# Altium PCB ESP_TAS5825M.PcbDoc
Units mm, origin at the board's own origin, x right, y up, seen from the top; angles counter-clockwise.
Board outline 77.53 x 50.13 mm, 2 copper layers (Top Layer, Bottom Layer); 44 components, 32 nets, 148 pads, 126 vias.
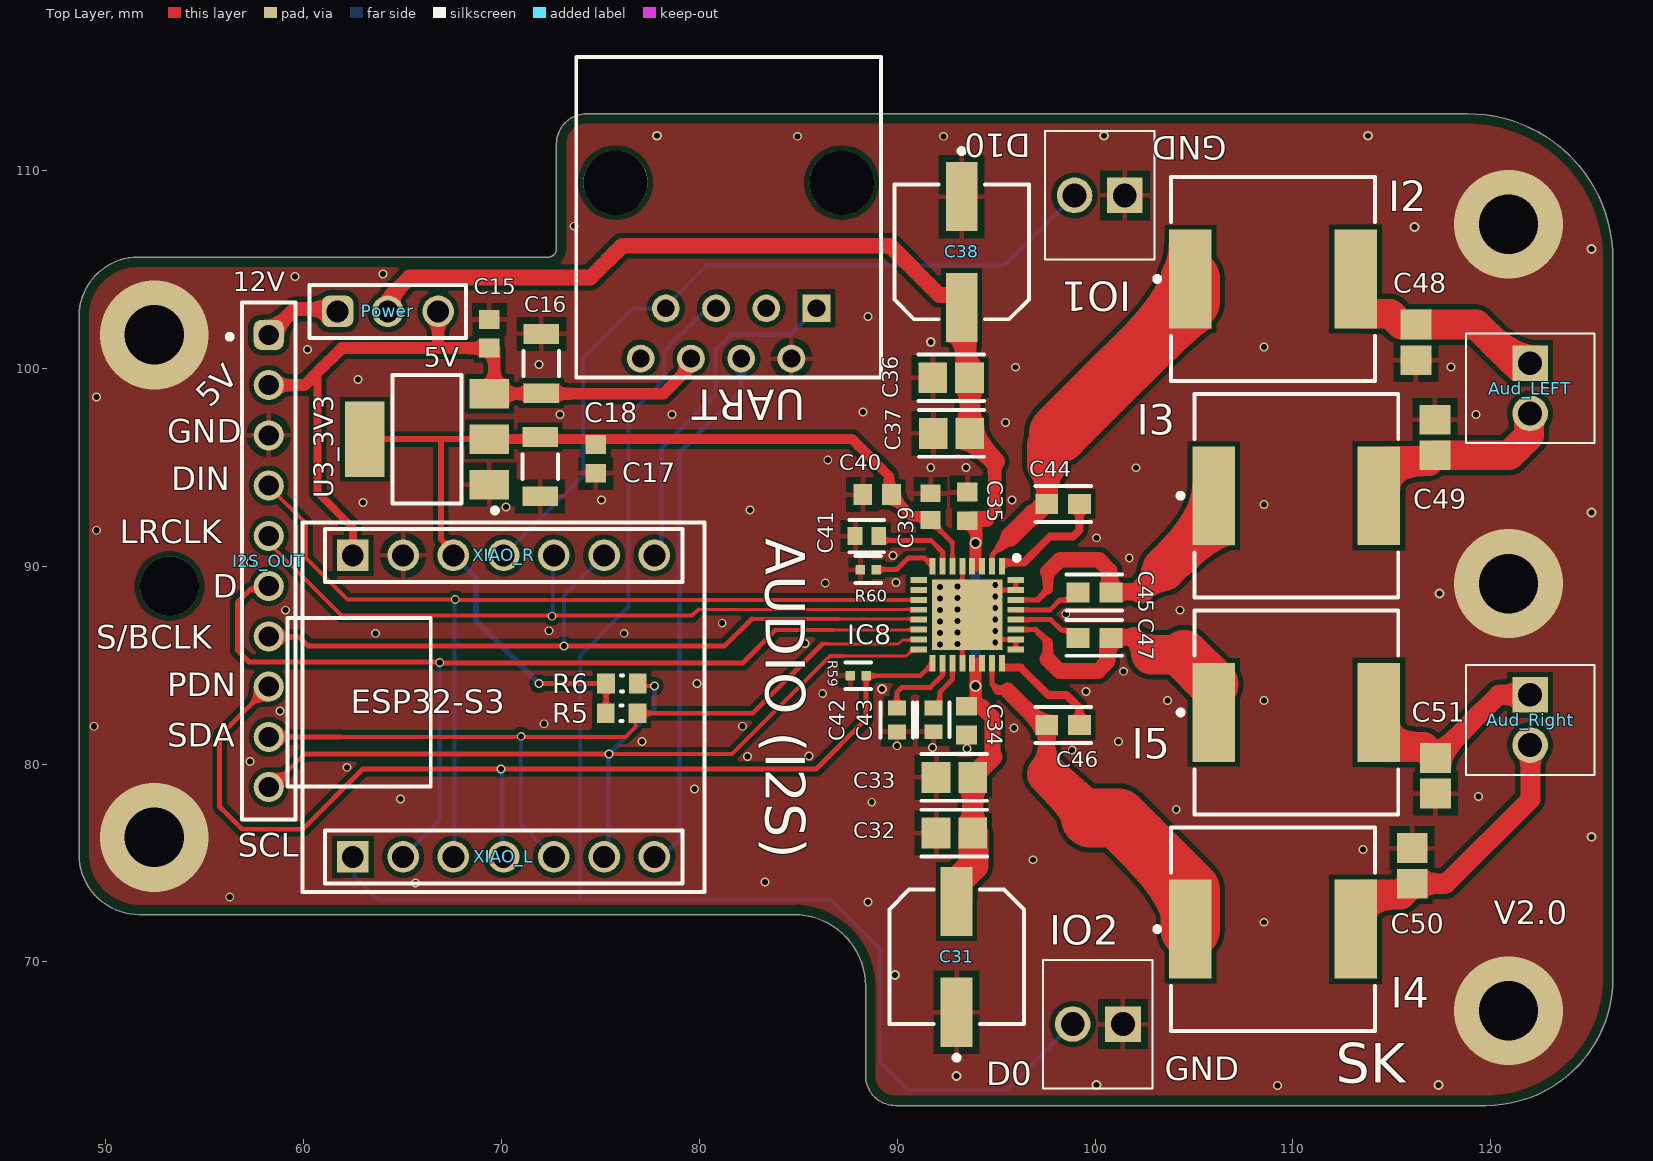
[diagram p0: Top Layer view]
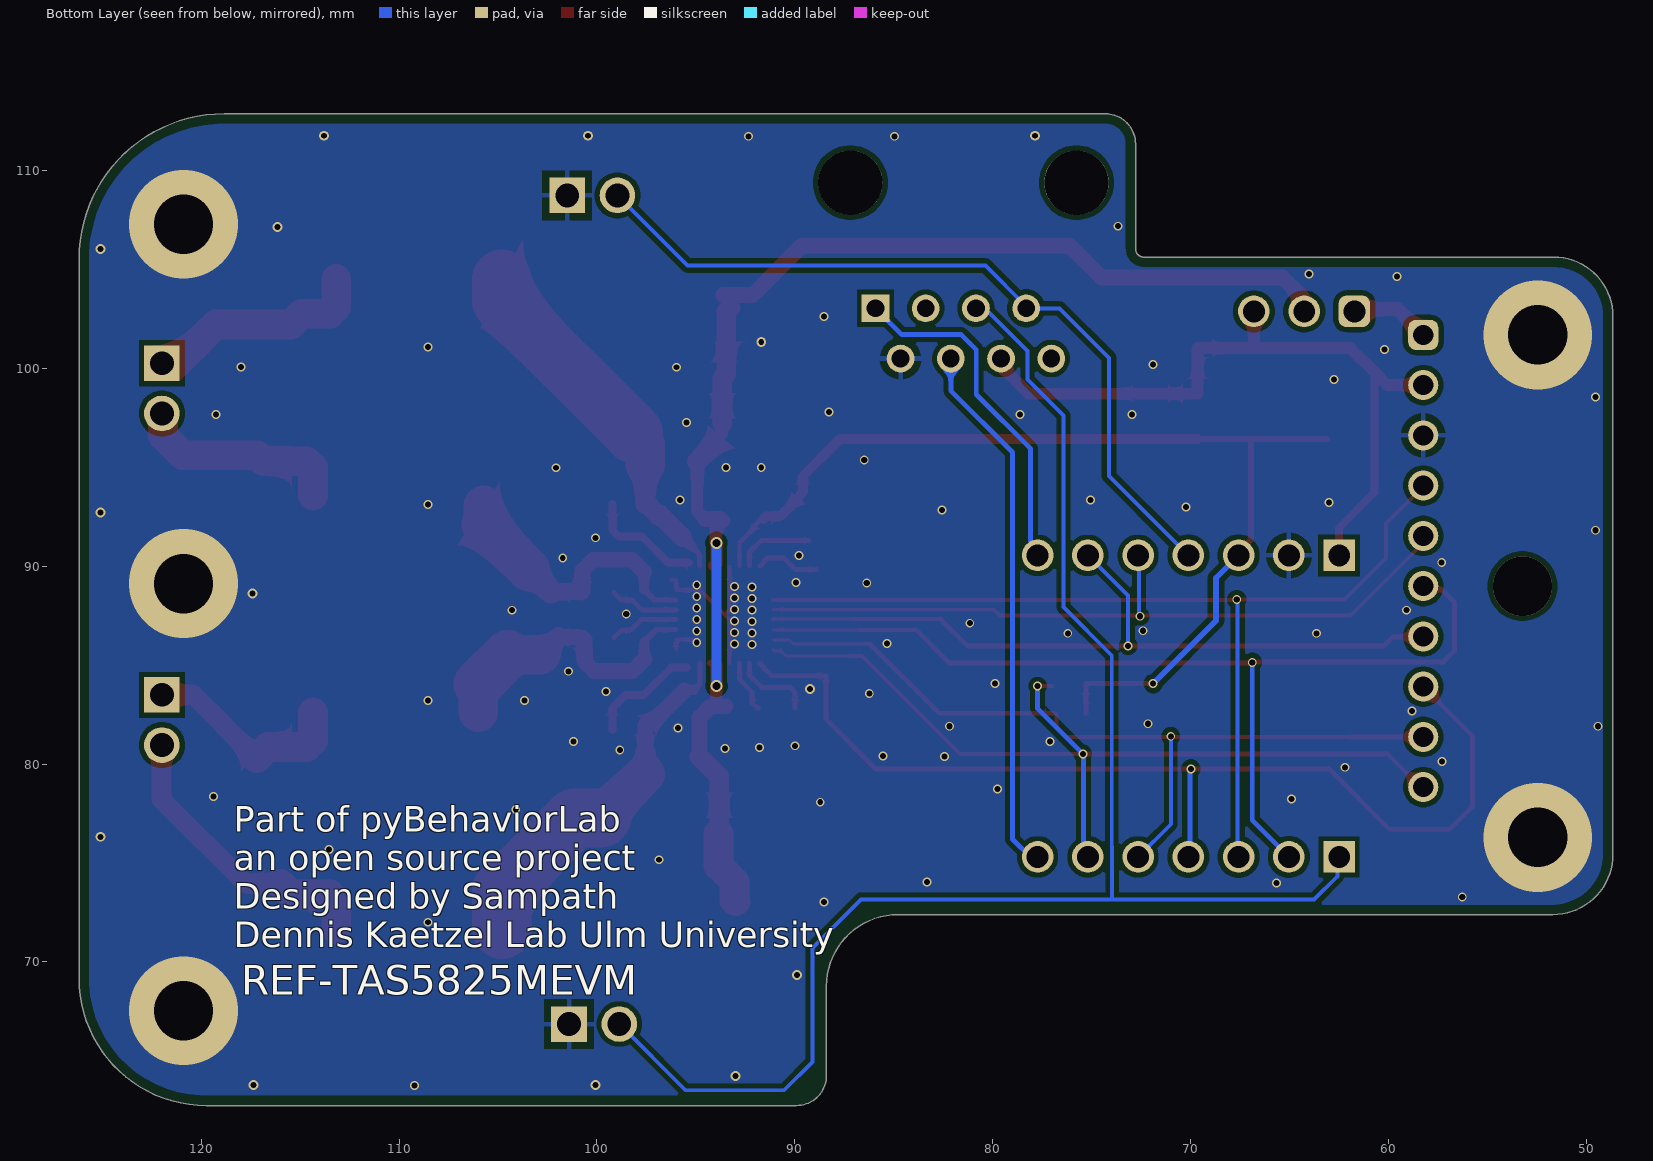
[diagram p1: Bottom Layer view, seen from below]
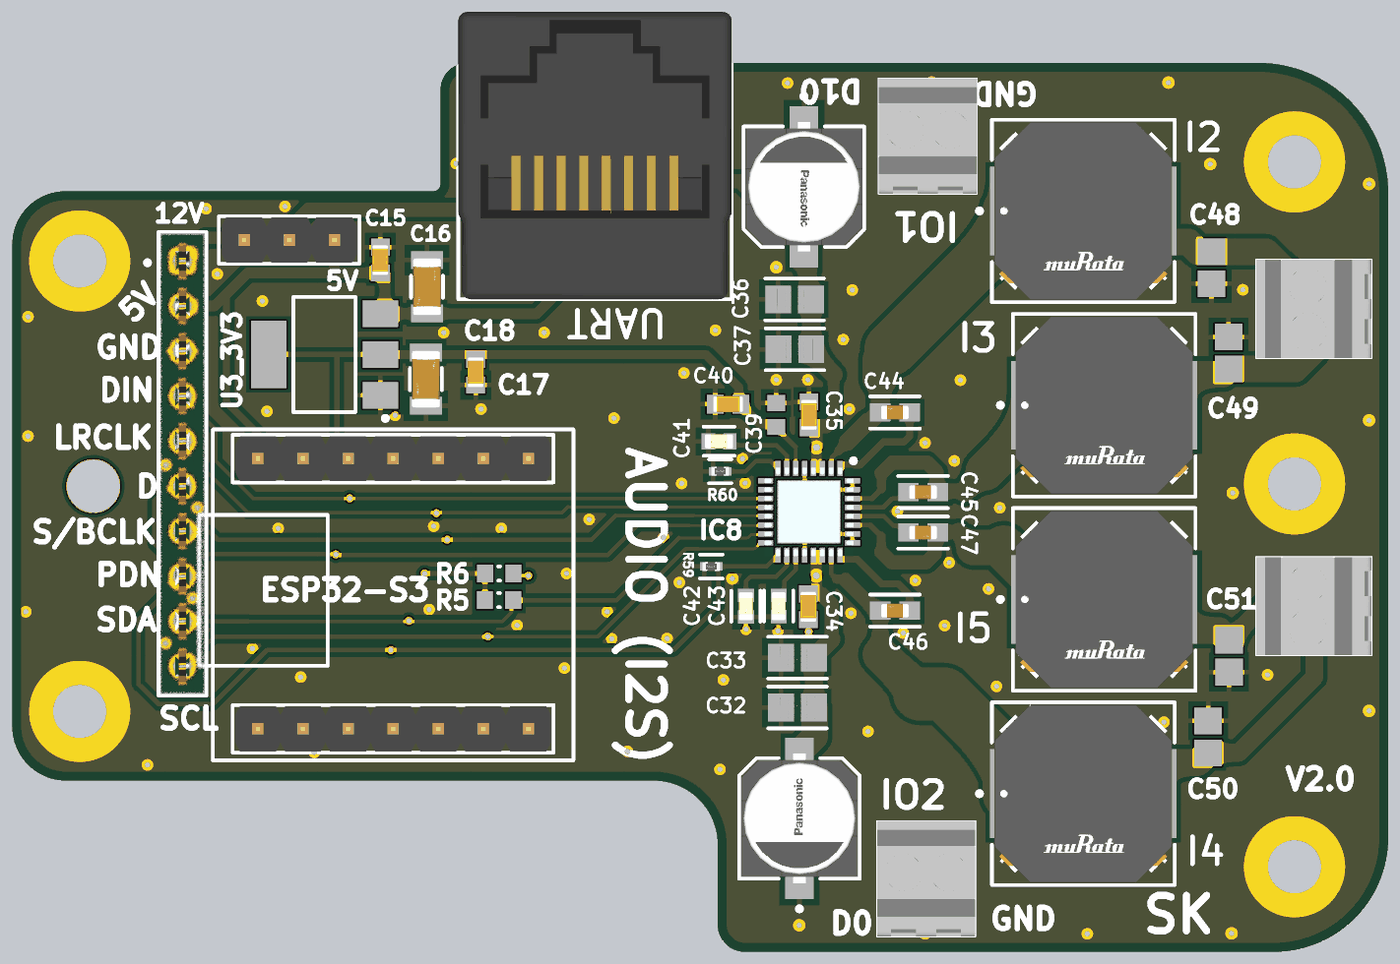
[diagram p2: 3D render of the assembled board from above, using the file's embedded part models]

## Layer stack, top to bottom
Top Solder: solder mask 0.0102, Solder Resist, Dk 3.5
Top Layer: signal copper 0.0356
Dielectric 1: dielectric 0.32, FR-4, Dk 4.8
Bottom Layer: signal copper 0.0356
Bottom Solder: solder mask 0.0102, Solder Resist, Dk 3.5

## Board outline
48.645,75.438 48.645,102.64 cw(c51.635,102.64) 51.635,105.631 72.36,105.631 ccw(c72.36,106.045) 72.775,106.045 72.775,111.349 cw(c74.295,111.349) 74.083,112.855 74.168,112.87 118.84,112.87 cw(c118.84,105.536) 126.174,105.536 126.174,69.173 cw(c119.742,69.173) 119.742,62.742 92.71,62.742 89.916,62.742 cw(c89.916,64.262) 88.396,64.262 88.396,68.782 ccw(c84.784,68.782) 84.784,72.394 51.689,72.394 cw(c51.689,75.438)

## Design rules (kind name [scope] priority, off if disabled: settings)
BoardOutlineClearance [All] p1: gap=0.254 ignorepadtopadclearanceinfootprint=FALSE except(0: Arc-SplitContinuation Track-SplitContinuation SMDPad-SplitContinuation THPad-SplitContinuation Via-SplitContinuation Fill-SplitContinuation Poly-SplitContinuation Region-SplitContinuation Text-SplitContinuation; 0.5: Poly-OutlineEdge Poly-CavityEdge Poly-CutoutEdge Poly-SplitBarrior)
Clearance [All] p1: gap=0.254 ignorepadtopadclearanceinfootprint=FALSE except(0.127: Arc-Arc Arc-Track Track-Track SMDPad-SMDPad; 0.2: Arc-SMDPad Track-SMDPad; 0.33: Arc-THPad Track-THPad; 0.5: THPad-THPad)
DiffPairsRouting [All] p1: maxlimit=0.203 minlimit=0.203 mostfreqgap=0.203 toplayer_minwidth=0.109 toplayer_maxwidth=0.19 toplayer_prefwidth=0.111 bottomlayer_minwidth=0.109 bottomlayer_maxwidth=0.19 bottomlayer_prefwidth=0.111 impedanceprofiledriven=TRUE maxuncoupledlength=12.7
MatchedLengths MatchedLengths_QSPI2 [InNetClass('QSPI')] p1: tolerance=7 checknetsindiffpair=FALSE checkdiffpairvsdiffpair=TRUE checkxsignals=TRUE checkothers=TRUE
PlaneClearance [All] p1: clearance=0.6
PlaneConnect [All] p1: pad.planeconnectstyle=Relief pad.reliefexpansion=0.508 pad.reliefentries=4 pad.reliefconductorwidth=0.254 pad.reliefairgap=0.254 via.planeconnectstyle=Direct via.reliefexpansion=0.508 via.reliefentries=4 via.reliefconductorwidth=0.254 via.reliefairgap=0.254
PolygonConnect [All] p1: thpad.connectstyle=Relief thpad.reliefconductorwidth=0.254 thpad.reliefentries=4 thpad.polygonreliefangle="90 Angle" thpad.airgapwidth=0.35 smdpad.connectstyle=Relief smdpad.reliefconductorwidth=0.254 smdpad.reliefentries=4 smdpad.polygonreliefangle="90 Angle" smdpad.airgapwidth=0.35 via.connectstyle=Direct via.reliefconductorwidth=0.254 via.reliefentries=4 via.polygonreliefangle="90 Angle" via.airgapwidth=0.254
RoutingVias [All] p1: holewidth=0.2 width=0.45 viastyle="Through Hole" minholewidth=0.2 minwidth=0.4 maxholewidth=3 maxwidth=5
SolderMaskExpansion [All] p1: expansion=0.102 istentingtop=FALSE
SupplyNets "Schematic Supply Nets_10" [InNet('GND')] p1: voltage=0.000
SupplyNets "Schematic Supply Nets_8" [InNet('Audio_POW')] p2: voltage=0.000
SupplyNets "Schematic Supply Nets_5" [InNet('+3V3')] p3: voltage=0.000
SupplyNets "Schematic Supply Nets_2" [InNet('+12V')] p4: voltage=0.000
SupplyNets "Schematic Supply Nets_1" [InNet('+5V')] p5: voltage=0.000
UnRoutedNet [All] p1: checkbadconnections=TRUE
Width [All] p1: maxlimit=5 minlimit=0.1 preferedwidth=0.2 minimp=50.000000 maximp=50.000000 favimp=50.000000
26 further rules are at their usual default settings.

## Classes and differential pairs
component class ESP_TAS5825M: Aud_LEFT Aud_Right C15 C16 C17 C18 C31 C32 C33 C34 C35 C36 C37 C39 C40 C41 C42 C43 C44 C45 C46 C47 C48 C49 C50 C51 I2 I2S_OUT I3 I4 I5 IC8 R5 R6 R59 R60 U3_3V3 UART XIAO_L XIAO_R

## Components (designator, comment, footprint, x,y, rotation, side; value= is the part's Value field where it differs from the comment)
Aud_LEFT "282834-2" 282834-2_1 121.986,100.266 r270 top
Aud_Right "282834-2" 282834-2_1 121.986,83.502 r270 top
C15 "GRM188R71H104KA93D" CAPC1608X90X35ML10T15 69.382,101.753 r270 top
C16 "CC1206KKX5R8BB105" FP-CC1206-1_25-MFG 72.013,100.247 r90 top value="1 uF"
C17 "CC1206KKX5R8BB105" FP-CC1206-1_25-MFG 71.949,95.036 r270 top value="1 uF"
C18 "GRM188R71H104KA93D" CAPC1608X90X35ML10T15 74.757,95.429 r90 top
C31 "25SVPF47M" FP-OS-CON-SMT-C6-MFG 92.998,70.263 r90 top
C32 "CL21A106KAYNNNE" FP-CL21-IPC_A 92.89,76.517 r180 top
C33 "CL21A106KAYNNNE" FP-CL21-IPC_A 92.89,79.327 r180 top
C34 "GRM188R71H104KA93D" CAPC1608X90X35ML10T15 93.506,82.197 r90 top
C35 "GRM188R71H104KA93D" CAPC1608X90X35ML10T15 93.538,93.027 r270 top
C36 "CL21A106KAYNNNE" FP-CL21-IPC_A 92.725,99.529 r180 top
C37 "CL21A106KAYNNNE" FP-CL21-IPC_A 92.741,96.715 r180 top
C38 "25SVPF47M" FP-OS-CON-SMT-C6-MFG 93.252,105.886 r270 top
C39 "C0603C475K8PACTU" CAPC1608X87X35NL15T15 91.685,93.015 r270 top
C40 "GRM188R71H104KA93D" CAPC1608X90X35ML10T15 88.981,93.626 r0 top
C41 "C0603C105K4PACTU" FP-C0603C105K4PACTU-MFG 88.467,91.524 r0 top
C42 "C0603C105K4PACTU" FP-C0603C105K4PACTU-MFG 89.985,82.231 r90 top
C43 "C0603C105K4PACTU" FP-C0603C105K4PACTU-MFG 91.826,82.236 r90 top
C44 "GCM188R71H224KA64D" FP-GCM188-0_1-IPC_A 98.382,93.154 r180 top
C45 "GCM188R71H224KA64D" FP-GCM188-0_1-IPC_A 99.966,88.667 r0 top
C46 "GCM188R71H224KA64D" FP-GCM188-0_1-IPC_A 98.382,81.978 r180 top
C47 "GCM188R71H224KA64D" FP-GCM188-0_1-IPC_A 99.966,86.385 r0 top
C48 "C0805C684K5RACTU" CAPC2013X145X50ML20T25 116.216,101.321 r270 top
C49 "C0805C684K5RACTU" CAPC2013X145X50ML20T25 117.176,96.505 r270 top
C50 "C0805C684K5RACTU" CAPC2013X145X50ML20T25 116.023,74.859 r270 top
C51 "C0805C684K5RACTU" CAPC2013X145X50ML20T25 117.202,79.413 r90 top
I2 "1274AS-H-100M=P3" FP-DEM10050C-MFG 108.992,104.521 r0 top
I2S_OUT "61301011821" 61301011821 58.232,90.267 r270 top
I3 "1274AS-H-100M=P3" FP-DEM10050C-MFG 110.172,93.567 r0 top
I4 "1274AS-H-100M=P3" FP-DEM10050C-MFG 108.992,71.659 r0 top
I5 "1274AS-H-100M=P3" FP-DEM10050C-MFG 110.172,82.613 r0 top
IC8 "TAS5825MRHBR" QFN50P500X500X100-33N-D 93.538,87.552 r270 top
IO1 "282834-2" 282834-2_1 101.502,108.746 r180 top (schematic designator GPIO)
IO2 "282834-2" 282834-2_1 101.408,66.861 r180 top (schematic designator GPIO)
Power "Comment" 61300311121 64.251,102.882 r0 top
R5 "10K" 0603R 76.07,82.572 r0 top value=12K1
R6 "10K" 0603R 76.081,84.072 r0 top value=12K1
R59 "ERJ-2RKF1003X" FP-ERJ2RK-IPC_C 88.027,84.467 r0 top
R60 "ERJ-2RKF1003X" FP-ERJ2RK-IPC_C 88.535,89.833 r0 top
U3_3V3 "NCP1117ST33T3G" ONSC-SOT-223-4-318H-01_A_V 66.234,96.424 r180 top
UART "615008138021" 615008138021 81.475,107.639 r180 top
XIAO_L "61300711121" 61300711121 70.104,75.311 r0 top
XIAO_R "61300711121" 61300711121 70.104,90.551 r0 top

## Footprints (in the part's own frame and the unit in brackets; to place one, negate y for a bottom-side part, rotate by r counter-clockwise, add the part's x,y. Pads: shape width x height; smd on the part's side, far side on the other; paste and mask are expansions set on the pad)
0603R [mm] "Chip Resistor, Body 1.6x0.8mm, IPC Medium Density"
  rect 0.9x1 smd: 1(-0.8,0) 2(0.8,0)
  silkscreen extent -0.05,-0.4 0.05,0.4, body extent -0.85,-0.47 0.85,0.47, height 0.6
282834-2_1 [mm]
  rect 1.8x1.8 hole 1.2: 1(0,0)
  round 1.8 hole 1.2: 2(2.54,0)
  silkscreen extent -1.5,-3.25 4.04,3.25, body extent -1.5,-3.25 4.04,3.25, height 9.87
61300311121 [mm] "Pin Header, pitch 2.54 mm, THT, Vertical, single row, 3p"
  rrect50% 1.6x1.6 hole 1.1: 1(-2.54,0)
  round 1.6 hole 1.1: 2(0,0) 3(2.54,0)
  silkscreen extent -3.96,-1.35 3.96,1.35, body extent -3.81,-1.27 3.81,1.27, height 8.57
61300711121 [mm] "Pin Header, pitch 2.54 mm, THT, Vertical, single row, 7p"
  rect 1.6x1.6 hole 1.1: 1(-7.62,0)
  round 1.6 hole 1.1: 2(-5.08,0) 3(-2.54,0) 4(0,0) 5(2.54,0) 6(5.08,0) 7(7.62,0)
  silkscreen extent -9.04,-1.35 9.04,1.35, body extent -8.89,-1.27 8.89,1.27, height 8.57
61301011821 [mm] "Socket Header, Pitch 2.54 mm, THT, Vertical, single row, 10p"
  rrect50% 1.52x1.52 hole 1.02: 1(-11.43,0)
  round 1.52 hole 1.02: 2(-8.89,0) 3(-6.35,0) 4(-3.81,0) 5(-1.27,0) 6(1.27,0) 7(3.81,0) 8(6.35,0) 9(8.89,0) 10(11.43,0)
  silkscreen extent -13.08,-2.1 13.08,1.35, body extent -12.95,-1.25 12.95,1.25, height 8.55
615008138021 [mm] "Modular Jack Vertical Plastic 8P8C"
  rect 1.4x1.4 hole 0.9: 1(-4.445,4.6)
  round 1.4 hole 0.9: 2(-3.175,7.14) 3(-1.905,4.6) 4(-0.635,7.14) 5(0.635,4.6) 6(1.905,7.14) 7(3.175,4.6) 8(4.445,7.14)
  round 3.25 hole 3.25 unplated: MH1(-5.715,-1.75) MH2(5.715,-1.75)
  silkscreen extent -7.7,-8.1 7.7,8.1, body extent -7.7,-8.1 7.7,8.1, height 16.5
CAPC1608X87X35NL15T15 [mm] "Chip Capacitor, 2-Leads, Body 1.60x0.80mm, IPC Medium Density"
  rect 0.9x1 smd: 1(-0.675,0) 2(0.675,0)
  body extent -0.87,-0.48 0.87,0.47, height 0.87
CAPC1608X90X35ML10T15 [mm] "Chip Capacitor, 2-Leads, Body 1.7x0.9mm, IPC Low Density"
  rect 0.95x1.05 smd: 1(-0.725,0) 2(0.725,0)
  body extent -0.85,-0.45 0.85,0.45, height 0.9
CAPC2013X145X50ML20T25 [mm] "Chip Capacitor, 2-Leads, Body 2.00x1.25mm, IPC Low Density"
  rect 1.5x1.55 smd: 1(-0.9,0) 2(0.9,0)
  body extent -1.1,-0.72 1.1,0.72, height 1.45
FP-C0603C105K4PACTU-MFG [mm]
  rect 0.75x0.9 smd paste+0 mask+0: 1(-0.6,0) 2(0.6,0)
  silkscreen extent -0.87,-0.82 0.87,0.82, body extent -1.2,-0.6 1.2,0.6, height 0.25
FP-CC1206-1_25-MFG [mm]
  rect 1x1.8 smd paste+0 mask+0: 1(-1.5,0) 2(1.5,0)
  silkscreen extent -0.63,-0.9 0.63,0.9, body extent -2.2,-1.25 2.2,1.25, height 0.25
FP-CL21-IPC_A [mm]
  rect 1.455x1.556 smd paste+0 mask+0: 1(-0.926,0) 2(0.926,0)
  silkscreen extent -1.65,-1.18 1.65,1.18, body extent -2.15,-1.28 2.15,1.28, height 0.25
FP-DEM10050C-MFG [mm]
  rect 2.15x5 smd paste+0 mask+0: 1(-4.175,0) 2(4.175,0)
  silkscreen extent -5.97,-5.15 5.15,5.15, body extent -5.35,-5.25 5.35,5.25, height 0.25
FP-ERJ2RK-IPC_C [mm]
  rect 0.468x0.472 smd paste+0 mask+0: 1(-0.402,0) 2(0.402,0)
  silkscreen extent -0.64,-0.67 0.64,0.67, body extent -0.74,-0.38 0.74,0.38, height 0.25
FP-GCM188-0_1-IPC_A [mm]
  rect 1.159x1.012 smd paste+0 mask+0: 1(-0.827,0) 2(0.827,0)
  silkscreen extent -1.41,-0.91 1.41,0.91, body extent -1.91,-1.01 1.91,1.01, height 0.25
FP-OS-CON-SMT-C6-MFG [mm]
  rect 3.5x1.6 smd paste+0 mask+0: 1(-2.8,0) 2(2.8,0)
  silkscreen extent -5.22,-3.4 3.4,3.4, body extent -4.8,-3.65 4.8,3.65, height 0.25
ONSC-SOT-223-4-318H-01_A_V [mm] "SOT223, 4-Leads, Body 6.5x3.5mm, Pitch 2.3mm"
  rect 2x1.5 smd: 1(-3.15,2.3) 2(-3.15,0) 3(-3.15,-2.3)
  rect 2x3.8 smd: 4(3.15,0)
  silkscreen extent -3.55,-3.25 1.75,3.72, body extent -1.75,-3.25 1.75,3.25, height 1.8
QFN50P500X500X100-33N-D [mm]
  rect 0.85x0.3 smd: 1(-2.45,1.75) 2(-2.45,1.25) 3(-2.45,0.75) 4(-2.45,0.25) 5(-2.45,-0.25) 6(-2.45,-0.75) 7(-2.45,-1.25) 8(-2.45,-1.75) 17(2.45,-1.75) 18(2.45,-1.25) 19(2.45,-0.75) 20(2.45,-0.25) 21(2.45,0.25) 22(2.45,0.75) 23(2.45,1.25) 24(2.45,1.75)
  rect 0.3x0.85 smd: 9(-1.75,-2.45) 10(-1.25,-2.45) 11(-0.75,-2.45) 12(-0.25,-2.45) 13(0.25,-2.45) 14(0.75,-2.45) 15(1.25,-2.45) 16(1.75,-2.45) 25(1.75,2.45) 26(1.25,2.45) 27(0.75,2.45) 28(0.25,2.45) 29(-0.25,2.45) 30(-0.75,2.45) 31(-1.25,2.45) 32(-1.75,2.45)
  rect 3.55x3.55 smd: 33(0,0)
  silkscreen extent -3,2.38 -2.75,2.63, body extent -2.55,-2.55 2.55,2.55, height 1

## Part data
Aud_LEFT Aud_Right IO1 IO2: "Connector", Manufacturer_Name="TE Connectivity", Mouser2 Part Number=571-282834-2, Datasheet Link=https://componentsearchengine.com//282834-2.pdf, Manufacturer_Part_Number=282834-2, Mouser2 Price/Stock=https://www.mouser.com/Search/Refine.aspx?Keyword=571-282834-2
C15 C18 C34 C35 C40: library part CMP-2100-03643-1, "Chip Capacitor, 0.1 uF, +/- 10%, 50 V, -55 to 125 degC, 0603 (1608 Metric), RoHS, Tape and Reel (C77055)", Capacitance=100nF, Case Code (Imperial)=0603, Case Code (Metric)=1608, Dielectric=X7R, Dielectric Material=Ceramic, Insulation Resistance=10GR, Manufacturer=Murata, Max Operating Temperature=125degC, Min Operating Temperature=-55degC, Package Description="2-Pin Surface Mount Device, Body 1.6 x 0.8 mm", Package Quantity=1, Tolerance=10%, Voltage=50V, Case/Package=0603, Contact Plating=Tin, Datasheet URL=http://psearch.en.murata.com/capacitor/product/GRM188R71H104KA93%23.pdf, Datasheet Version=42675.0, Depth=0.8mm, Height=0.8mm, Lead Free=LeadFree, Length=1.6mm, Manufacturer URL=http://www.murata.com/, Material=Ceramic, Mount=SurfaceMount, Number of Pins=2, Package Reference=0603, Packaging=TapeandReel, Radiation Hardening=No, REACH SVHC=NoSVHC, RoHSCompliant=true, Termination=SMD/SMT, Thickness=0.035inch, Voltage Rating=50V, Voltage Rating (DC)=50V, Width=0.8mm
C16 C17: library part CMP-03422-001167-1, "10uF 25V X5R ±10% 1206 Multilayer Ceramic Capacitors MLCC - SMD/SMT ROHS (C128855)", Capacitance="1 uF", Manufacturer=Yageo, Package=CC1206-1.25, Temperature="-55°C to +125°C", Temperature Characteristic=X5R, Temperature Coefficient=15%, Temperature Range High=+125°C, Temperature Range Low=-55°C, Tolerance=0.1, Voltage Rating="25 V", Automotive=No, Automotive Grade=NA, Category=Cap, ComponentLink2Description=Datasheet, ComponentLink2URL=http://www.yageo.com/documents/recent/UPY-NP0X7R_HV_1KV-to-3KV_11.pdf, Device Class L1="Passive Components", Device Class L2=Capacitors, Device Class L3="Ceramic Capacitors", Digikey Description="CAP CER 1UF 25V X5R 1206", Footprint Url=http://www.yageo.com/exep/pages/download/literatures/UPY-C_GEN_24.pdf, Height=1.45mm, Lead Free=Yes, Manufacturer Part Number=CC1206KKX5R8BB105, Material=Ceramic, Mouser Description="Multilayer Ceramic Capacitors MLCC - SMD/SMT 1.0uF 25V X5R 10%", Octopart=https://octopart.com/cc1206kkx5r8bb105-yageo-20779154, RoHS=TRUE
C31 C38: library part CMP-05427-000065-2, "Conductive Polymer Aluminum Solid Capacitors (OS-CON) 47uF ±20% 25V (C136280)", Capacitance=47uF, Case/Package=Radial, ESR (Equivalent Series Resistance)=30mR, Leakage Current=235uA, Max Operating Temperature=105°C, Min Operating Temperature=-55°C, Package Quantity=1000, Ripple Current=2.8A, Tolerance=20%, Voltage=25V, Diameter=6.3mm, Dissipation Factor=12%, Height=5.9mm, Height - Seated (Max)=0.236inch, Length=5.9mm, Life (Hours)=5000Hour, Mount="Surface Mount", Number of Pins=6, Packaging="Tape and Reel", Polarity=Polar, REACH SVHC="No SVHC", Ripple Current (AC)=2.8A, RoHS Compliant=Yes, Series="OS-CON™, SVPF", Termination=SMD/SMT, Voltage Rating=25V, Voltage Rating (DC)=25V
C32 C33 C36 C37: library part CMP-13271-002975-1, "CL21 Series 0805 10uF 25V ±10% Tolerance X5R Multilayer Ceramic Chip Capacitor (C15850)", Capacitance=10uF, Case Code (Imperial)=0805, Case Code (Metric)=2012, Dielectric=X5R, Max Operating Temperature=85°C, Min Operating Temperature=-55°C, Package Quantity=1, Tolerance=10%, Voltage Rating=25V, Case/Package=0805, Depth=1.25mm, Height=1.25mm, Length=2mm, Mount="Surface Mount", Packaging="Tape and Reel", Radiation Hardening=No, Thickness=0.057inch, Width=0.049inch
C39: library part CMP-2006-03238-1, "10V 4.7uF X5R ±10% 0603 Multilayer Ceramic Capacitors MLCC - SMD/SMT ROHS (C6475754)", Manufacturer=Kemet, Part Number=C0603C475K8PACTU
C41 C42 C43: library part CMP-2006-02279-2, "CAP CER 1UF 16V X5R 0603 (C2181804)", Capacitance=1uF, Case Code (Imperial)=0603, Case Code (Metric)=1608, Dielectric=X5R, Dielectric Material=Ceramic, Max Operating Temperature=85°C, Min Operating Temperature=-55°C, Package Quantity=4000, Tolerance=10%, Voltage=16V, Case/Package=0603, Construction=Flat, Contact Plating=Tin, Depth=0.8mm, Dissipation Factor=5%, Height=0.8mm, Length=1.6mm, Mount="Surface Mount", Packaging="Tape and Reel", Radiation Hardening=No, Termination=SMD/SMT, Voltage Rating=16V, Voltage Rating (DC)=16V, Width=0.8mm
C44 C45 C46 C47: library part CMP-2006-02383-2, "Ceramic Capacitor for Automotive 220nF  ±10% 50VDC X7R 0603 Paper T/R (C97857)", Capacitance=220nF, Case Code (Imperial)=0603, Case Code (Metric)=1608, Dielectric=X7R, Max Operating Temperature=125°C, Min Operating Temperature=-55°C, Package Quantity=10, Ratings=AEC-Q200, Tolerance=10%, Voltage=50V, Case/Package=0603, Depth=0.8mm, Height=0.8mm, Lead Free="Lead Free", Length=1.6mm, Mount="Surface Mount", Packaging="Tape and Reel", Radiation Hardening=No, REACH SVHC="No SVHC", Termination=SMD/SMT, Thickness=0.035inch, Voltage Rating=50V, Voltage Rating (DC)=50V, Width=0.031inch
C48 C49 C50 C51: library part CMP-1036-04712-2, "0805 Multilayer Ceramic Capacitors MLCC - SMD/SMT ROHS (C22402009)", Manufacturer=Kemet, Part Number=C0805C684K5RACTU
I2 I3 I4 I5: library part CMP-06042-000104-1, "10uH 45mΩ 6.2A 8.5A Molded Inductor ±20% SMD,8.5x8mm Power Inductors ROHS (C41413139)", Case/Package=SMD/SMT, Current Rating=4.4A, DC Resistance (DCR)=30.4mR, Inductance=10uH, Resistor Type=Wirewound, Saturation Current=6.2A, Test Frequency=100kHz, Tolerance=20%, Core Material=Ferrite, Height - Seated (Max)=0.199inch, Length=0.394inch, Max DC Current=4.4A, Mount="Surface Mount", Number of Pins=2, Packaging="Tape and Reel", Shielding=Shielded, Width=0.394inch
I2S_OUT: library part CMP-1502-01332-4, "THT Vertical Socket Header WR-PHD, Pitch 2.54 mm, Single Row, 10 pins", Color=Black, Contact Resistance=20mΩ, Current Rating=3A, Flammability Rating="UL94 V-0", Insulation Resistance=1GΩ, Max Operating Temperature=125°C, Min Operating Temperature=-40°C, Operating Supply Voltage=250V, Connector Type="Header, Socket", Contact Gender=Female, Contact Material=Copper, Contact Plating=Gold, Gender=Female, Height=8.5mm, Housing Material=PBT, Insulation=Insulated, Lead Free="Lead Free", Lead Pitch=2.54mm, Length=25.9mm, Mount="Through Hole", Number Of Contacts=10, Number of Pins=10, Number of Positions=10, Number Of Rows=1, Orientation=Vertical, Pitch=2.54mm, RoHS=Compliant, Termination="Through Hole", Voltage Rating=250V, Width=25.9mm
IC8: "-25℃~+85℃ 0.03% 111dB 17.5mA 2-Channel 38Wx1@8Ω 4.5V~26.4V 72dB 90% Class D VQFN-32(5x5) Audio Amplifiers ROHS (C471049)", Manufacturer_Name="Texas Instruments", Mouser Part Number=595-TAS5825MRHBR, Arrow Part Number=TAS5825MRHBR, Arrow Price/Stock=https://www.arrow.com/en/products/tas5825mrhbr/texas-instruments?region=nac, Datasheet Link=http://www.ti.com/lit/gpn/tas5825m, Height=1mm, Manufacturer_Part_Number=TAS5825MRHBR, Mouser Price/Stock=https://www.mouser.co.uk/ProductDetail/Texas-Instruments/TAS5825MRHBR?qs=f9yNj16SXrKGX4MqJgnnYg%3D%3D
R5: library part Res_12K1_1%_0603, "-55?~+155? 100mW 2.2kO 75V Thick Film Resistor ±1% ±100ppm/? 0603 Chip Resistor - Surface Mount ROHS (C125931)", Manuf_1=VISHAY, Manuf_Part_1="MCT 0603-50 1% P5 12K1", Distrib=FARNELL, ECCN_US/EU=n/a, Order=2325243
R6: library part Res_12K1_1%_0603, "-55℃~+155℃ 100mW 10kΩ 75V Thick Film Resistor ±1% ±100ppm/℃ 0603 Chip Resistor - Surface Mount ROHS (C99198)", Manuf_1=VISHAY, Manuf_Part_1="MCT 0603-50 1% P5 12K1", Distrib=FARNELL, ECCN_US/EU=n/a, Order=2325243
R59 R60: library part CMP-2002-00608-4, "RES SMD 100K OHM 1% 1/10W 0402 (C192169)", Case Code (Imperial)=0402, Case Code (Metric)=1005, Max Operating Temperature=155°C, Max Power Dissipation=100mW, Min Operating Temperature=-55°C, Package Quantity=1, Resistance=100kR, Temperature Coefficient=100ppm/°C, Tolerance=1%, Voltage Rating=50V, Case/Package=0402, Composition="Thick Film", Contact Plating=Tin, Depth=0.5mm, Features="Automotive AEC-Q200", Height=0.35mm, Lead Free="Lead Free", Length=1mm, Military Standard=Not, Mount="Surface Mount", Number of Pins=2, Number of Terminations=2, Packaging="Tape and Reel", Power Rating=100mW, Radiation Hardening=No, REACH SVHC="No SVHC", Termination=SMD/SMT, Voltage Rating (DC)=50V, Width=0.5mm
U3_3V3: library part CMP-1679-00010-1, "Low-Dropout Positive Fixed Voltage Regulator, 1 A, 3.3 V Output Voltage, 0 to 125 degC, 4-Pin SOT-223 (318H-01), Pb-Free, Tape and Reel (C26537)", Case Code (Imperial)=0603, Case Code (Metric)=1608, Max Operating Temperature="155 degC", Min Operating Temperature="-55 degC", Package Quantity=5000, Power Rating="100 mW", Resistance="220 kohm", Tolerance=1%, Type (Resistor)="Thick Film", Voltage Rating="75 V", Case\Package=0603, ComponentLink1Description="Manufacturer URL", ComponentLink1URL=http://www.onsemi.com/, ComponentLink2Description=Datasheet, ComponentLink2URL=http://www.onsemi.com/pub_link/Collateral/NCP1117-D.PDF, DatasheetVersion="Rev. 27, 09/2014", Height="0.45 mm", Length="1.55 mm", Mount="Surface Mount", PackageDescription="4-Pin Small Outline Transistor, Body 6.5 x 3.5 mm, Pitch 2.3 mm", PackageReference=SOT-223-4-318H-01_A, Packaging="Tape and Reel", Radiation Hardening=No, REACH SVHC=Unknown, RoHSCompliant=true, Weight="7.1E-05 oz", Width="0.85 mm"
UART: library part CMP-1502-01725-1, "Modular Jack WR-MJ, Plastic, Vertical Entry, THT, 8P8C (C86492)", Contact Resistance=20mOhm, Manufacturer="Wurth Elektronik", Operating Temperature=-40to85degC, Rated Current=1.5A, Withstanding Voltage=1000VAC, Working Voltage=120VAC, Compliance=Leadfree/RoHS, Datasheet URL=https://katalog.we-online.de/em/datasheet/615008138021.pdf, Entrance=Vertical, Manufacturer URL=http://www.we-online.de, Mounting Technology=THT, Package Reference=615008138021, Packaging=Tray, Part Number=615008138021, Pin Number=8P8C, Port=1x1, Publisher=WurthElektronik
XIAO_L XIAO_R: library part CMP-1502-01074-1, "THT Vertical Pin Header WR-PHD, Pitch 2.54 mm, Single Row, 7 pins", Contact Resistance=20mOhm, Manufacturer="Wurth Elektronik", Operating Temperature=-40to105degC, Rated Current=3A, Withstanding Voltage=500VAC, Working Voltage=250VAC, Datasheet URL=https://katalog.we-online.de/em/datasheet/6130xx11121.pdf, Gender=Male, Manufacturer URL=http://www.we-online.de, Mounting Technology=THT, Orientation=Vertical, Package Reference=61300711121, Packaging=Bag, Part Number=61300711121, Pin Number=7, Pitch=2.54mm, Publisher=WurthElektronik, Row Number=Single

## Via types
v1: diameter 0.45, hole 0.305, Top Layer to Bottom Layer, 60 vias
v2: diameter 0.45, hole 0.3, Top Layer to Bottom Layer, 44 vias
v3: diameter 0.5, hole 0.3, Top Layer to Bottom Layer, 14 vias
v4: diameter 5.5, hole 3, Top Layer to Bottom Layer, 5 vias
v5: diameter 0.6, hole 0.4, Top Layer to Bottom Layer, 2 vias
v6: diameter 3, hole 3, Top Layer to Bottom Layer, 1 vias

## Nets (pads, with @x,y where several pads share a name; then routed paths per layer and width w, separated by ;. In a path a pad name is that pad's centre, name@x,y a point inside that pad or via, vN(x,y) a via of type N, cw(c..) or ccw(c..) an arc to the next point about the centre after c; other vN are vias at no path point)
+3V3: C17.1 C18.2 C39.2 C40.2 IC8.6 R5.1 R6.1 U3_3V3.2 U3_3V3.4 XIAO_R.3 | length 52.6
  Top Layer w0.2: IC8.6 92.788,91.199
  Top Layer w0.25: C39.2 91.735,92.34 92.06,92.015 92.06,91.927 92.788,91.199
  Top Layer w0.254: v1(71.882,84.074) 75.28,84.074 R6.1 75.281,82.584 R5.1
  Top Layer w0.3: U3_3V3.4 66.929,96.424 ; XIAO_R.3 67.564,90.742 66.929,91.377 66.929,96.424 ; U3_3V3.2@69.638,96.424 66.929,96.424
  Top Layer w0.5: U3_3V3.2@69.638,96.424 87.726,96.424 89.584,94.566 89.584,93.748 C40.2 ; C40.2@89.842,93.419 89.863,93.419 89.931,93.351 89.931,93.33 90.733,92.528 91.447,92.528 C39.2@91.571,92.404
  Bottom Layer w0.3: XIAO_R.3 68.71,89.405 68.71,89.157 68.707,89.154 68.707,87.249 v1(71.882,84.074)
+5V: C15.2 C16.1 I2S_OUT.2 Power.3 U3_3V3.3 UART.6 XIAO_R.1 | length 37.4
  Top Layer w0.4: 60.706,99.822 60.706,93.726 62.484,91.948 XIAO_R.1
  Top Layer w0.5: 66.791,101.038 66.802,101.028 ; U3_3V3.3@69.636,98.727 U3_3V3.3@69.638,98.724
  Top Layer w0.6: I2S_OUT.2 60.041,99.157 60.706,99.822 61.912,101.028 66.802,101.028 69.636,101.028 U3_3V3.3@69.636,98.727 ; 66.791,101.038 Power.3 ; U3_3V3.3@69.638,98.724 78.176,98.724 UART.6@79.951,100.499
+12V: I2S_OUT.1 Power.1 | length 4.3
  Top Layer w0.7: I2S_OUT.1 59.532,102.997 Power.1@61.976,102.997
Audio_POW: C31.2 C32.1 C33.1 C34.2 C35.2 C36.1 C37.1 C38.2 IC8.3 IC8.4 IC8.21 IC8.22 Power.2 | length 68.4
  Top Layer w0.2: IC8.21 IC8.21@93.911,85.102
  Top Layer w0.25: IC8.4@93.768,90.045 94.113,90.045
  Top Layer w0.3: IC8.21@93.911,85.102 IC8.22
  Top Layer w0.5: C33.1 C33.1@93.815,79.378
  Top Layer w0.6: C35.2 93.713,92.127 94.007,92.127 94.007,91.232 v5(93.959,91.184) 93.959,90.159 94.073,90.045 ; C37.1 94.094,96.288 C37.1@94.094,96.133 ; C37.1@93.667,97.173 C37.1@93.667,97.223 ; v5(93.948,83.951) 93.948,85.011 94.038,85.102 ; C34.2@93.968,82.922 v5@93.968,83.93 ; 94.525,92.388 94.935,92.799 94.935,95.292
  Top Layer w0.8: Power.2@64.251,103.009 64.404,103.162 64.404,103.649 65.35,104.595 74.496,104.595 76.106,106.205 89.64,106.205 92.13,103.715 C38.2@93.608,103.715 ; C34.2 94.244,82.922 94.808,82.359 94.808,80.37 ; C35.2@93.763,92.388 94.525,92.388
  Top Layer w1: C38.2 93.462,102.876 93.462,99.718 C36.1 ; C37.1@93.667,97.223 C36.1@93.667,99.529 ; C32.1 C33.1 ; C33.1@93.815,79.378 94.808,80.37 ; C37.1@94.094,96.133 94.935,95.292
  Top Layer w1.5: C31.2 93.048,73.113 93.048,74.063 93.854,74.869 C32.1@93.854,76.478
  Bottom Layer w0.5: v5(93.948,83.951) 93.953,83.957 93.953,91.179 v5(93.959,91.184)
GND: C15.1 C16.2 C17.2 C18.1 C31.1 C32.2 C33.2 C34.1 C35.1 C36.2 C37.2 C38.1 C39.1 C40.1 C41.1 C42.1 C43.1 C48.2 C49.1 C50.1 C51.1 I2S_OUT.3 IC8.5 IC8.20 IC8.25 IC8.26 IC8.31 IC8.32 IC8.33 IO1.1 IO2.1 R59.1 R60.1 U3_3V3.1 UART.2 XIAO_R.2 | length 10.5
  Top Layer w0.2: IC8.20 93.288,87.302 IC8.33 ; IC8.5 93.288,87.802 IC8.33 ; v2(94.953,86.143) 95.111,86.302 IC8.26 IC8.25 ; IC8.32@96.263,89.302 IC8.32 IC8.31 94.788,88.802 IC8.33
  other v1: 109.22,63.754 88.519,73.025 56.261,73.279 65.659,73.985 83.312,74.041 64.897,78.232 79.756,78.74 62.18,79.841 57.277,80.137 82.423,80.391 85.54,80.405 77.089,81.153 49.403,81.915 82.169,81.915 72.136,82.042 58.801,82.677 103.655,83.208 108.547,83.208 86.233,83.566 79.883,84.074 85.344,86.106 63.627,86.614 76.2,86.614 72.39,86.741 81.153,87.122 98.516,87.581 59.078,87.78 104.29,87.78 86.36,89.154 89.939,89.177 57.3,90.193 89.789,90.551 49.53,91.821 82.55,92.837 70.217,92.993 108.547,93.114 62.992,93.218 75.057,93.345 86.487,95.377 72.954,97.663 78.613,97.663 49.53,98.552 62.738,99.441 71.882,100.203 60.198,100.965 88.519,102.616 59.563,104.648 64.008,104.775 73.66,107.188 84.963,111.735 92.329,111.735
  other v2: 108.547,72.009 96.863,75.168 113.538,75.692 104.102,77.708 88.712,78.075 119.38,78.359 98.843,80.72 93.518,80.793 91.79,80.84 89.992,80.927 101.181,81.137 95.903,81.833 99.53,83.677 101.435,84.693 92.159,86.042 93.048,86.067 92.159,86.626 93.048,86.651 94.953,86.727 92.159,87.21 93.048,87.235 94.953,87.312 92.159,87.794 93.048,87.82 94.953,87.896 92.159,88.378 93.048,88.404 94.953,88.48 92.159,88.963 93.048,88.988 94.953,89.064 101.727,90.424 100.076,91.44 95.806,93.347 102.07,94.98 91.694,94.996 93.472,94.996 95.466,97.266 119.253,97.663 88.265,97.79 95.974,100.06 117.983,100.076 108.547,101.076
  other v3: 100.076,63.779 117.348,63.779 92.988,64.231 89.885,69.342 125.095,76.327 89.219,83.79 117.414,88.616 125.095,92.71 91.694,101.346 125.095,106.045 116.144,107.158 77.851,111.76 100.457,111.76 113.792,111.76
  other v4: 120.896,67.534 52.443,76.297 120.896,89.124 52.443,101.697 120.896,107.285
NetAud_LEFT_1: Aud_LEFT.1 C48.1 I2.2 | length 11.5
  Top Layer w1.5: I2.2 113.167,103.096 113.492,102.771 114.917,102.771 115.467,102.221 119.268,102.221 121.2,100.289 121.836,100.289 Aud_LEFT.1@121.986,100.139
NetAud_LEFT_2: Aud_LEFT.2 C49.2 I3.2 | length 10.7
  Top Layer w1.5: I3.2 114.347,94.992 114.672,95.317 116.862,95.317 117.151,95.605 120.934,95.605 121.929,96.6 121.929,97.541 Aud_LEFT.2@121.986,97.599
NetAud_Right_1: Aud_Right.1 C51.2 I5.2 | length 10.8
  Top Layer w1: C51.2 117.227,80.313 118.934,82.02 118.934,82.045 120.391,83.502 Aud_Right.1
  Top Layer w1.5: I5.2 114.347,81.188 114.672,80.863 116.627,80.863 117.177,80.313 C51.2
NetAud_Right_2: Aud_Right.2 C50.2 I4.2 | length 14.9
  Top Layer w1: C50.2 117.742,73.959 122.004,78.221 Aud_Right.2@122.004,80.732
  Top Layer w1.5: I4.2 113.167,73.084 113.492,73.409 115.448,73.409 115.998,73.959 C50.2
NetC41_2: C41.2 IC8.7 | length 4
  Top Layer w0.25: C41.2@89.285,91.313 91.696,91.313 92.288,90.721 IC8.7
NetC42_2: C42.2 IC8.18 | length 4.1
  Top Layer w0.25: C42.2 89.985,83.632 90.236,83.883 91.675,83.883 92.288,84.496 IC8.18
NetC43_2: C43.2 IC8.19 | length 2.7
  Top Layer w0.25: C43.2 91.901,82.836 92.151,83.086 92.151,83.639 92.788,84.276 IC8.19
NetC44_1: C44.1 IC8.1 | length 5.9
  Top Layer w0.4: IC8.1@95.35,90.191 96.407,90.191 97.711,91.496 98.88,91.496 99.209,91.824 C44.1
NetC44_2: C44.2 I2.1 IC8.2 | length 19
  Top Layer w0.25: IC8.2 94.813,90.027 94.813,90.601 95.207,90.995
  Top Layer w0.5: 95.207,90.995 95.715,91.503
  Top Layer w1: 95.715,91.503 96.858,92.646 96.858,92.544 C44.2@97.555,93.241 ; C44.2 C44.2@97.555,93.241 ; 97.555,95.123 C44.2@97.555,93.241 ; C44.2@97.558,93.244 C44.2@97.555,93.241
  Top Layer w2: 97.555,95.123 97.555,96.13 98.157,96.732
  Top Layer w3: 98.157,96.732 104.817,103.392 I2.1
NetC45_1: C45.1 IC8.29 | length 3.5
  Top Layer w0.25: IC8.29 97.726,87.802 98.218,88.294 98.766,88.294 C45.1
NetC45_2: C45.2 I3.1 IC8.30 | length 14.8
  Top Layer w0.25: IC8.30 97.086,88.302
  Top Layer w0.3: 97.086,88.302 97.62,88.836
  Top Layer w0.5: 97.62,88.836 97.62,89.725
  Top Layer w0.8: 97.62,89.725 98.225,90.329 100.191,90.329 100.731,89.788 100.731,88.729 C45.2 100.834,88.709 102.319,88.709
  Top Layer w1.2: 102.319,88.709 103.462,89.852
  Top Layer w2: I3.1@105.733,92.123 I3.1@105.733,93.073
  Top Layer w2.2: 103.462,89.852 I3.1@105.733,92.123
NetC46_1: C46.1 IC8.24 | length 5.7
  Top Layer w0.4: IC8.24@95.438,84.876 96.246,84.876 97.632,83.489 98.559,83.489 99.209,82.839 C46.1 C46.1@99.209,81.724
NetC46_2: C46.2 I4.1 IC8.23 | length 18.8
  Top Layer w0.25: IC8.23 94.788,84.048 95.08,83.756
  Top Layer w0.5: 95.08,83.756 95.588,83.756
  Top Layer w0.8: 95.588,83.717 97.221,82.084 97.449,82.084 C46.2 97.555,80.645
  Top Layer w1: 97.555,79.502 97.555,80.645
  Top Layer w2: 97.555,79.502 99.779,77.279
  Top Layer w3: 99.779,77.279 101.156,77.279 104.817,73.618 I4.1
NetC47_1: C47.1 IC8.28 | length 3.5
  Top Layer w0.25: IC8.28 97.762,87.302 98.298,86.766 98.758,86.766 C47.1
NetC47_2: C47.2 I5.1 IC8.27 | length 15.2
  Top Layer w0.25: IC8.27 96.983,86.802 96.985,86.804
  Top Layer w0.3: 96.985,86.804 97.602,86.187
  Top Layer w0.5: 97.602,85.298 97.602,86.187
  Top Layer w0.8: 97.602,85.298 98.194,84.706 100.145,84.706 100.614,85.175 100.614,86.279 C47.2@100.714,86.379 ; C47.2 100.882,86.296 100.882,86.333 100.972,86.423 101.938,86.423
  Top Layer w1: 101.938,86.423 102.827,85.534
  Top Layer w2: 102.827,85.534 104.501,85.534 ; I5.1 I5.1@105.997,84.038
  Top Layer w2.5: 104.501,85.534 I5.1@105.997,84.038
NetIC8_8: IC8.8 R60.2 | length 3.3
  Top Layer w0.25: R60.2@88.89,89.839 89.969,89.839 90.541,90.411 91.379,90.411 IC8.8
PA13: IO2.2 UART.5 XIAO_L.1 | length 79.6
  Bottom Layer w0.2: XIAO_L.1 62.578,75.217 62.578,74.328 63.75,73.156 73.954,73.156 74.041,73.156 ; UART.5 80.611,102.809 80.153,102.809 78.23,100.887 78.23,99.439 76.419,97.628 76.419,87.94 73.977,85.498 73.977,75.843 73.954,75.82 73.954,73.243 74.041,73.156 ; IO2.2 95.524,63.517 90.534,63.517 89.101,64.95 89.101,70.696 86.641,73.156 74.041,73.156
PA14: IO1.2 UART.7 XIAO_R.4 | length 40
  Bottom Layer w0.2: XIAO_R.4 74.112,94.559 74.112,100.528 76.623,103.039 UART.7 78.3,103.144 80.363,105.206 95.422,105.206 IO1.2
PB6: I2S_OUT.8 IC8.17 R59.2 XIAO_L.4 | length 52.9
  Top Layer w0.25: I2S_OUT.8 55.753,81.438 55.753,77.841 55.87,77.724 55.88,77.724 56.896,76.708 59.944,76.708 62.992,79.756 v1(69.977,79.756) 85.898,79.756 88.429,82.287 R59.2 91.153,84.467 IC8.17
  Bottom Layer w0.25: v1(69.977,79.756) 70.015,79.718 70.015,75.4 XIAO_L.4
PB8_I2C1_SCL: I2S_OUT.10 IC8.16 R6.2 XIAO_L.6 | length 46.1
  Top Layer w0.15: 87.324,85.459 90.453,85.459 90.72,85.727 91.013,85.727 IC8.16
  Top Layer w0.2: I2S_OUT.10@58.296,78.774 60.032,80.51 ; v1(75.438,80.518) 81.65,80.518 86.591,85.459 87.324,85.459 ; R6.2@77.007,83.947 v1(77.724,83.947)
  Top Layer w0.25: 63.84,80.518 v1(75.438,80.518)
  Top Layer w0.254: 60.032,80.51 63.832,80.51
  Bottom Layer w0.25: XIAO_L.6 75.4,75.527 75.4,80.48 v1(75.438,80.518) 77.724,82.804 v1(77.724,83.947)
PB9_I2C1_SDA: I2S_OUT.9 IC8.15 R5.2 XIAO_L.5 | length 42
  Top Layer w0.15: 86.201,86.074 90.067,86.074 90.263,86.27 91.057,86.27 IC8.15
  Top Layer w0.2: 61.915,81.377 70.963,81.377 v1(70.993,81.407) 71.023,81.377 76.258,81.377 76.77,81.89 76.77,82.473 R5.2
  Top Layer w0.25: R5.2 82.699,82.572 86.201,86.074
  Top Layer w0.254: I2S_OUT.9 61.915,81.377
  Bottom Layer w0.2: v1(70.993,81.407) 70.993,76.962 XIAO_L.5
PB12_I2S2_WS: I2S_OUT.5 IC8.12 XIAO_R.5 | length 38
  Top Layer w0.15: 79.949,87.823 91.067,87.823 IC8.12
  Top Layer w0.2: I2S_OUT.5 58.232,91.187 61.916,87.503 79.629,87.503 79.949,87.823
  Bottom Layer w0.2: v1(72.545,87.475) 72.593,87.522 72.593,90.5 XIAO_R.5
PB13_I2S2_SCK: I2S_OUT.7 IC8.13 XIAO_R.6 | length 39
  Top Layer w0.15: 87.023,87.336 87.026,87.339 IC8.13@91.051,87.339
  Top Layer w0.2: 82.637,87.336 87.023,87.336 ; IC8.13@91.051,87.339 IC8.13
  Top Layer w0.25: 59.778,86.428 60.227,85.979 v1(73.152,85.979) 81.28,85.979 82.637,87.336
  Top Layer w0.254: I2S_OUT.7 58.261,86.428 59.778,86.428
  Bottom Layer w0.2: v1(73.152,85.979) 73.152,88.519 XIAO_R.6
PB15_I2S2_SD: I2S_OUT.6 IC8.14 XIAO_L.2 | length 50.4
  Top Layer w0.15: 86.772,86.784 91.071,86.784 IC8.14
  Top Layer w0.2: 83.863,86.784 86.772,86.784
  Top Layer w0.25: 57.743,85.158 66.865,85.158 66.91,85.113 82.192,85.113 83.863,86.784
  Top Layer w0.254: 57.743,85.158 57.235,85.158 56.642,85.751 56.642,88.172 57.297,88.827 58.062,88.827 I2S_OUT.6
  Bottom Layer w0.25: XIAO_L.2 66.876,77.163 v1(66.876,85.147)
PC2: I2S_OUT.4 IC8.11 XIAO_L.3 | length 49.3
  Top Layer w0.2: I2S_OUT.4 58.232,94.041 60.115,92.158 60.115,90.419 62.222,88.313 v1(67.659,88.313) 67.676,88.296 90.413,88.296 90.42,88.303 91.087,88.303 IC8.11
  Bottom Layer w0.2: XIAO_L.3 67.612,75.359 67.612,88.265 v1(67.659,88.313)
PF6_UART7_RX: UART.4 XIAO_L.7 | length 27.2
  Bottom Layer w0.25: XIAO_L.7 78.089,75.311 78.597,75.819 78.613,75.819 78.994,76.2 78.994,95.758 82.11,98.874 UART.4
PF7_UART7_TX: UART.1 XIAO_R.7 | length 17.6
  Bottom Layer w0.25: XIAO_R.7 77.724,90.916 78.08,91.272 78.08,95.939 80.825,98.684 80.825,100.948 81.586,101.709 84.591,101.709 UART.1
pads on no net: IC8.9 IC8.10 UART.3 UART.8 UART.MH1 UART.MH2
copper on no net:
  other v6: 53.213,88.997

## Polygon pours and split planes (outlines as drawn)
GND on Top Layer "GND" (solid, remove dead copper, pour order 1): 44.701,120.401 45.082,120.02 133.093,120.02 133.093,57.282 132.585,56.774 42.415,56.774
GND on Bottom Layer "GND" (solid, pour order 0): 44.386,120.396 44.767,120.015 132.779,120.015 132.779,57.277 132.27,56.769 42.1,56.769

## Silkscreen, mask and mechanical layers (free items; w line width, h text height)
Top Overlay:
  lines w0.2: 59.182,78.867 66.421,78.867 66.421,87.376 59.182,87.376 59.182,78.867 ; 59.944,73.533 80.264,73.533 80.264,92.202 59.944,92.202 59.944,73.533
  text "D10" at 96.755,111.868 h1.2 r180
  text "GND" at 106.661,111.741 h1.2 r180
  text "12V" at 56.407,103.905 h1
  text "5V" at 66.059,100.095 h1
  text "5V" at 55.245,97.975 h1.2 r45
  text "GND" at 53.111,96.255 h1.2
  text "DIN" at 53.311,93.842 h1.2
  text "AUDIO (I2S)" at 83.363,91.421 h2 r270
  text "LRCLK" at 50.712,91.175 h1.2
  text "D" at 55.391,88.411 h1.2
  text "S/BCLK" at 49.512,85.841 h1.2
  text "PDN" at 53.111,83.428 h1.2
  text "ESP32-S3" at 62.376,82.569 h1.2
  text "SDA" at 53.111,80.888 h1.2
  text "SCL" at 56.661,75.33 h1.2
  text "V2.0" at 120.161,71.901 h1.2
  text "GND" at 103.524,64.027 h1.2
  text "SK" at 112.16,63.9 h2
  text "D0" at 94.507,63.773 h1.2
Bottom Overlay:
  text "Part of pyBehaviorLab / an open source project / Designed by Sampath / Dennis Kaetzel Lab Ulm University" at 118.364,70.739 h1.3
  text "REF-TAS5825MEVM" at 117.964,68.345 h1.5
Mechanical 1:
  lines w0.5: 48.895,86.741 48.895,91.186 ; 74.168,112.619 87.63,112.619 118.84,112.619 cw(c118.84,105.536) 125.923,105.536 125.923,69.173 cw(c119.742,69.173) 119.742,62.992 92.71,62.992 89.916,62.992 cw(c89.916,64.262) 88.646,64.262 88.646,68.782 ccw(c84.784,68.782) 84.784,72.644 51.689,72.644 cw(c51.689,75.438) 48.895,75.438 48.895,102.64 cw(c51.635,102.64) 51.635,105.38 59.464,105.38 69.535,105.38 72.36,105.38 ccw(c72.36,106.045) 73.025,106.045 73.025,110.841 73.025,111.349 cw(c74.295,111.349) 74.295,112.619